# Altium PCB Briac_Charger.PcbDoc (part 4 of 4)
Units mm, origin at the board's own origin, x right, y up, seen from the top; angles counter-clockwise.
Board outline 70.05 x 79.98 mm, 2 copper layers (Top Layer, Bottom Layer), stack 1.448 mm thick; 114 components, 62 nets, 335 pads, 3733 vias.
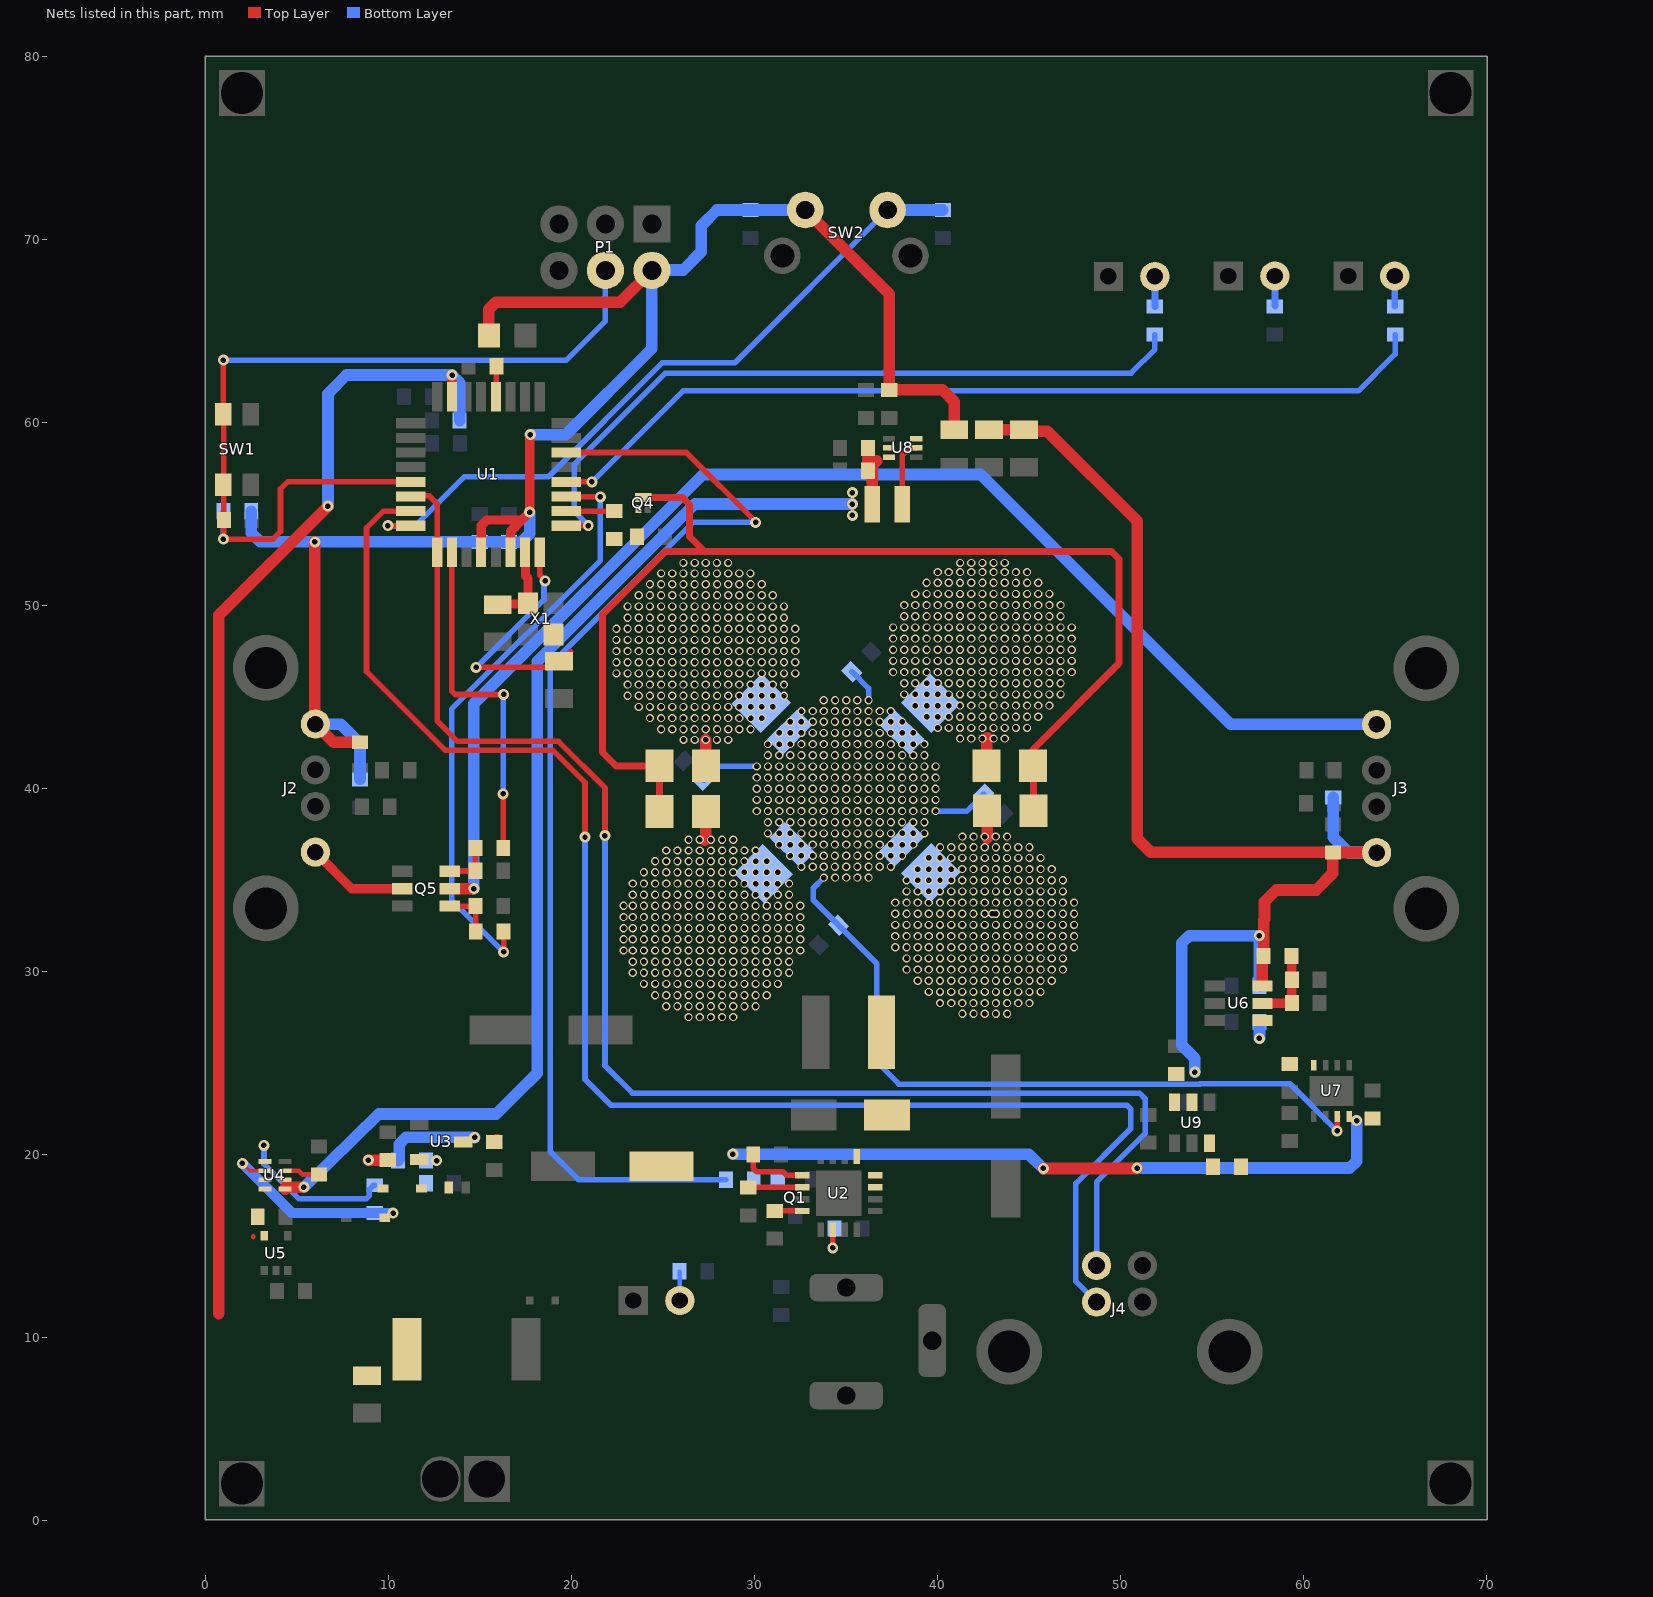
[diagram p3: the nets of this part, all layers, seen from the top]

## Via types
v1: diameter 0.45, hole 0.3, Top Layer to Bottom Layer, 2562 vias
v2: diameter 0.45, hole 0.3, Top Layer to Bottom Layer, tented both sides, 1106 vias
v3: diameter 0.6, hole 0.3, Top Layer to Bottom Layer, tented both sides, 65 vias

## Nets (pads, with @x,y where several pads share a name; then routed paths per layer and width w, separated by ;. In a path a pad name is that pad's centre, name@x,y a point inside that pad or via, vN(x,y) a via of type N, cw(c..) or ccw(c..) an arc to the next point about the centre after c; other vN are vias at no path point) (continued)
LAMP_GND: Q4.3 R26.1 R27.1 R28.1 R29.1 | length 64.5
  Top Layer w0.381: Q4.3@23.931,55.895 26.07,55.895 26.467,55.499 26.467,53.759 27.28,52.946 ; R29.1@24.816,38.735 R26.1@24.816,41.224 22.454,41.224 21.717,41.961 21.717,49.505 25.159,52.946 25.649,52.946 27.28,52.946 ; R28.1@45.25,38.799 45.25,41.224 45.25,42.151 49.936,46.838 49.936,52.54 49.53,52.946 27.28,52.946
  Top Layer w0.457: R28.1@45.25,38.799 R28.1@45.263,38.786
LED1: R11.2 U1.12 | length 49.3
  Top Layer w0.305: U1.12@19.729,56.75 19.732,56.747 21.13,56.747 v3(21.133,56.744)
  Bottom Layer w0.305: v3(21.133,56.744) 26.111,61.722 63.017,61.722 65.024,63.729 R11.2@65.024,64.795
LED3: R13.2 U1.9 | length 40
  Top Layer w0.305: U1.9@19.729,54.35 19.732,54.353 20.926,54.353 v3(20.93,54.356)
  Bottom Layer w0.305: v3(20.93,54.356) 20.168,55.118 20.168,57.709 20.472,58.014 25.146,62.687 50.597,62.687 51.892,63.983 R13.2@51.892,64.795
LED_IN: C32.1 C33.1 C34.1 C35.1 LED5.1 LED6.1 LED7.1 LED8.1 U7.7 | length 47.5
  Top Layer w0.305: v3(61.849,21.283) 61.867,21.3 61.867,22.067 U7.7@61.869,22.07
  Bottom Layer w0.305: C32.1@27.234,40.431 27.249,40.431 28.017,41.2 v2(30.141,41.2) ; v2(33.805,35.125) 33.223,34.543 33.223,33.894 C33.1@34.6,32.517 36.703,30.415 36.703,25.044 37.906,23.841 54.345,23.841 54.362,23.858 59.274,23.858 v3(61.849,21.283) ; C35.1@35.326,46.375 35.337,46.375 36.246,45.466 36.246,44.81 v2(36.244,44.808) ; v2(39.907,38.76) 41.619,38.76 C34.1@42.54,39.68
  other v2: 34.415,35.125 35.025,35.125 35.635,35.125 36.245,35.125 32.581,35.71 33.191,35.71 33.801,35.71 34.411,35.71 35.027,35.71 35.637,35.71 36.247,35.71 36.857,35.71 37.467,35.71 31.971,36.32 32.581,36.32 33.191,36.32 33.801,36.32 34.411,36.32 35.027,36.32 35.637,36.32 36.247,36.32 36.857,36.32 37.467,36.32 38.077,36.32 31.361,36.93 31.971,36.93 32.581,36.93 33.191,36.93 33.801,36.93 34.411,36.93 35.027,36.93 35.637,36.93 36.247,36.93 36.857,36.93 37.467,36.93 38.077,36.93 38.687,36.93 30.751,37.54 31.361,37.54 31.971,37.54 32.581,37.54 33.191,37.54 33.801,37.54 34.411,37.54 35.027,37.54 35.637,37.54 36.247,37.54 36.857,37.54 37.467,37.54 38.077,37.54 38.687,37.54 39.297,37.54 30.751,38.15 31.361,38.15 31.971,38.15 32.581,38.15 33.191,38.15 33.801,38.15 34.411,38.15 35.027,38.15 35.637,38.15 36.247,38.15 36.857,38.15 37.467,38.15 38.077,38.15 38.687,38.15 39.297,38.15 30.141,38.76 30.751,38.76 31.361,38.76 31.971,38.76 32.581,38.76 33.191,38.76 33.801,38.76 34.411,38.76 35.027,38.76 35.637,38.76 36.247,38.76 36.857,38.76 37.467,38.76 38.077,38.76 38.687,38.76 39.297,38.76 30.141,39.37 30.751,39.37 31.361,39.37 31.971,39.37 32.581,39.37 33.191,39.37 33.801,39.37 34.411,39.37 35.027,39.37 35.637,39.37 36.247,39.37 36.857,39.37 37.467,39.37 38.077,39.37 38.687,39.37 39.297,39.37 39.907,39.37 30.141,39.98 30.751,39.98 31.361,39.98 31.971,39.98 32.581,39.98 33.191,39.98 33.801,39.98 34.411,39.98 35.027,39.98 35.637,39.98 36.247,39.98 36.857,39.98 37.467,39.98 38.077,39.98 38.687,39.98 39.297,39.98 39.907,39.98 30.141,40.59 30.751,40.59 31.361,40.59 31.971,40.59 32.581,40.59 33.191,40.59 33.801,40.59 34.411,40.59 35.027,40.59 35.637,40.59 36.247,40.59 36.857,40.59 37.467,40.59 38.077,40.59 38.687,40.59 39.297,40.59 39.907,40.59 30.751,41.2 31.361,41.2 31.971,41.2 32.581,41.2 33.191,41.2 33.801,41.2 34.411,41.2 35.027,41.2 35.637,41.2 36.247,41.2 36.857,41.2 37.467,41.2 38.077,41.2 38.687,41.2 39.297,41.2 39.907,41.2 30.751,41.81 31.361,41.81 31.971,41.81 32.581,41.81 33.191,41.81 33.801,41.81 34.411,41.81 35.027,41.81 35.637,41.81 36.247,41.81 36.857,41.81 37.467,41.81 38.077,41.81 38.687,41.81 39.297,41.81 30.751,42.42 31.361,42.42 31.971,42.42 32.581,42.42 33.191,42.42 33.801,42.42 34.411,42.42 35.027,42.42 35.637,42.42 36.247,42.42 36.857,42.42 37.467,42.42 38.077,42.42 38.687,42.42 39.297,42.42 31.361,43.03 31.971,43.03 32.581,43.03 33.191,43.03 33.801,43.03 34.411,43.03 35.027,43.03 35.637,43.03 36.247,43.03 36.857,43.03 37.467,43.03 38.077,43.03 38.687,43.03 31.971,43.64 32.581,43.64 33.191,43.64 33.801,43.64 34.411,43.64 35.027,43.64 35.637,43.64 36.247,43.64 36.857,43.64 37.467,43.64 38.077,43.64 32.582,44.224 33.192,44.224 33.802,44.224 34.412,44.224 35.025,44.224 35.635,44.224 36.245,44.224 36.855,44.224 37.465,44.224 33.804,44.808 34.414,44.808 35.024,44.808 35.634,44.808
MOS_1: R32.2 U1.2 | length 18.9
  Top Layer w0.305: U1.2@13.479,52.9 13.479,45.307 13.657,45.129 v3(16.307,45.129) ; v3(16.281,39.7) 16.286,39.696 R32.2@16.286,36.744
  Bottom Layer w0.305: v3(16.281,39.7) 16.294,39.713 16.294,45.116 v3(16.307,45.129)
MOS_2: R34.2 U1.11 | length 32.5
  Top Layer w0.305: v3(16.307,31.064) R34.2@16.307,32.182 ; U1.11@19.729,55.95 19.786,56.007 19.888,55.905 19.913,55.931 v3(21.59,55.931)
  Bottom Layer w0.305: v3(16.307,31.064) 13.462,33.909 13.462,44.326 21.59,52.454 v3(21.59,55.931)
MOS_4: R30.2 U1.10 | length 2.6
  Top Layer w0.305: U1.10@19.729,55.15 19.732,55.153 22.349,55.153 R30.2@22.352,55.156
NetC3_2: C3.2 U1.20 | length 1.7
  Top Layer w0.305: U1.20@15.879,61.4 15.895,61.416 15.895,63.052 C3.2@15.911,63.068
NetC10_2: C10.2 U2.10 | length 3
  Top Layer w0.305: C10.2@29.667,18.186 29.687,18.207 U2.10@32.62,18.207
NetC19_2: C19.2 U4.7 | length 2.1
  Top Layer w0.254: U4.7@4.363,19.11 5.121,19.11 5.334,18.898 C19.2@6.223,18.898 C19.2@6.115,18.79
NetC39_2: R23.1 U9.6
NetD1_2: D1.2 L2.1 U2.3 U2.4 U2.5
NetL3_1: L3.1 U8.5 | length 3.6
  Top Layer w0.305: L3.1@38.097,55.525 38.097,58.225 38.47,58.598 U8.5@38.85,58.598
NetLED1_2: LED1.2 R11.1 | length 1.7
  Bottom Layer w0.381: R11.1@64.999,66.345 LED1.2@64.999,67.996
NetLED2_2: LED2.2 R12.1 | length 1.7
  Bottom Layer w0.381: R12.1@58.445,66.345 LED2.2@58.445,67.996
NetLED3_2: LED3.2 R13.1 | length 1.7
  Bottom Layer w0.381: R13.1@51.892,66.319 LED3.2@51.892,67.97
NetLED4_2: LED4.2 R2.1 | length 1.6
  Bottom Layer w0.203: R2.1@25.908,13.614 R2.1@25.933,13.589
  Bottom Layer w0.254: LED4.2@25.933,12.014 R2.1@25.933,13.589
NetLED5_2: LED5.2 R26.2 | length 1.4
  Top Layer w0.635: v2(27.354,42.644) 27.354,41.226 R26.2@27.356,41.224
  other v2: 26.134,42.644 26.744,42.644 27.964,42.644 28.574,42.644 24.91,43.228 25.52,43.228 26.13,43.228 26.74,43.228 27.356,43.228 27.966,43.228 28.576,43.228 29.186,43.228 29.796,43.228 24.3,43.838 24.91,43.838 25.52,43.838 26.13,43.838 26.74,43.838 27.356,43.838 27.966,43.838 28.576,43.838 29.186,43.838 29.796,43.838 30.406,43.838 23.69,44.448 24.3,44.448 24.91,44.448 25.52,44.448 26.13,44.448 26.74,44.448 27.356,44.448 27.966,44.448 28.576,44.448 29.186,44.448 29.796,44.448 30.406,44.448 31.016,44.448 23.08,45.058 23.69,45.058 24.3,45.058 24.91,45.058 25.52,45.058 26.13,45.058 26.74,45.058 27.356,45.058 27.966,45.058 28.576,45.058 29.186,45.058 29.796,45.058 30.406,45.058 31.016,45.058 31.626,45.058 23.08,45.668 23.69,45.668 24.3,45.668 24.91,45.668 25.52,45.668 26.13,45.668 26.74,45.668 27.356,45.668 27.966,45.668 28.576,45.668 29.186,45.668 29.796,45.668 30.406,45.668 31.016,45.668 31.626,45.668 22.47,46.278 23.08,46.278 23.69,46.278 24.3,46.278 24.91,46.278 25.52,46.278 26.13,46.278 26.74,46.278 27.356,46.278 27.966,46.278 28.576,46.278 29.186,46.278 29.796,46.278 30.406,46.278 31.016,46.278 31.626,46.278 32.236,46.278 22.47,46.888 23.08,46.888 23.69,46.888 24.3,46.888 24.91,46.888 25.52,46.888 26.13,46.888 26.74,46.888 27.356,46.888 27.966,46.888 28.576,46.888 29.186,46.888 29.796,46.888 30.406,46.888 31.016,46.888 31.626,46.888 32.236,46.888 22.47,47.498 23.08,47.498 23.69,47.498 24.3,47.498 24.91,47.498 25.52,47.498 26.13,47.498 26.74,47.498 27.356,47.498 27.966,47.498 28.576,47.498 29.186,47.498 29.796,47.498 30.406,47.498 31.016,47.498 31.626,47.498 32.236,47.498 22.47,48.108 23.08,48.108 23.69,48.108 24.3,48.108 24.91,48.108 25.52,48.108 26.13,48.108 26.74,48.108 27.356,48.108 27.966,48.108 28.576,48.108 29.186,48.108 29.796,48.108 30.406,48.108 31.016,48.108 31.626,48.108 32.236,48.108 22.47,48.718 23.08,48.718 23.69,48.718 24.3,48.718 24.91,48.718 25.52,48.718 26.13,48.718 26.74,48.718 27.356,48.718 27.966,48.718 28.576,48.718 29.186,48.718 29.796,48.718 30.406,48.718 31.016,48.718 31.626,48.718 32.236,48.718 23.08,49.328 23.69,49.328 24.3,49.328 24.91,49.328 25.52,49.328 26.13,49.328 26.74,49.328 27.356,49.328 27.966,49.328 28.576,49.328 29.186,49.328 29.796,49.328 30.406,49.328 31.016,49.328 31.626,49.328 23.08,49.938 23.69,49.938 24.3,49.938 24.91,49.938 25.52,49.938 26.13,49.938 26.74,49.938 27.356,49.938 27.966,49.938 28.576,49.938 29.186,49.938 29.796,49.938 30.406,49.938 31.016,49.938 31.626,49.938 23.69,50.548 24.3,50.548 24.91,50.548 25.52,50.548 26.13,50.548 26.74,50.548 27.356,50.548 27.966,50.548 28.576,50.548 29.186,50.548 29.796,50.548 30.406,50.548 31.016,50.548 24.3,51.158 24.91,51.158 25.52,51.158 26.13,51.158 26.74,51.158 27.356,51.158 27.966,51.158 28.576,51.158 29.186,51.158 29.796,51.158 30.406,51.158 24.912,51.742 25.522,51.742 26.132,51.742 26.742,51.742 27.354,51.742 27.964,51.742 28.574,51.742 29.184,51.742 29.794,51.742 26.133,52.315 26.743,52.315 27.353,52.315 27.963,52.315 28.573,52.315
NetLED6_2: LED6.2 R27.2 | length 1.6
  Top Layer w0.635: R27.2@42.697,41.224 42.697,42.723 42.748,42.774
  other v2: 41.247,42.72 41.857,42.72 42.467,42.72 43.077,42.72 43.687,42.72 40.023,43.304 40.633,43.304 41.243,43.304 41.853,43.304 42.469,43.304 43.079,43.304 43.689,43.304 44.299,43.304 44.909,43.304 39.413,43.914 40.023,43.914 40.633,43.914 41.243,43.914 41.853,43.914 42.469,43.914 43.079,43.914 43.689,43.914 44.299,43.914 44.909,43.914 45.519,43.914 38.803,44.524 39.413,44.524 40.023,44.524 40.633,44.524 41.243,44.524 41.853,44.524 42.469,44.524 43.079,44.524 43.689,44.524 44.299,44.524 44.909,44.524 45.519,44.524 46.129,44.524 38.193,45.134 38.803,45.134 39.413,45.134 40.023,45.134 40.633,45.134 41.243,45.134 41.853,45.134 42.469,45.134 43.079,45.134 43.689,45.134 44.299,45.134 44.909,45.134 45.519,45.134 46.129,45.134 46.739,45.134 38.193,45.744 38.803,45.744 39.413,45.744 40.023,45.744 40.633,45.744 41.243,45.744 41.853,45.744 42.469,45.744 43.079,45.744 43.689,45.744 44.299,45.744 44.909,45.744 45.519,45.744 46.129,45.744 46.739,45.744 37.583,46.354 38.193,46.354 38.803,46.354 39.413,46.354 40.023,46.354 40.633,46.354 41.243,46.354 41.853,46.354 42.469,46.354 43.079,46.354 43.689,46.354 44.299,46.354 44.909,46.354 45.519,46.354 46.129,46.354 46.739,46.354 47.349,46.354 37.583,46.964 38.193,46.964 38.803,46.964 39.413,46.964 40.023,46.964 40.633,46.964 41.243,46.964 41.853,46.964 42.469,46.964 43.079,46.964 43.689,46.964 44.299,46.964 44.909,46.964 45.519,46.964 46.129,46.964 46.739,46.964 47.349,46.964 37.583,47.574 38.193,47.574 38.803,47.574 39.413,47.574 40.023,47.574 40.633,47.574 41.243,47.574 41.853,47.574 42.469,47.574 43.079,47.574 43.689,47.574 44.299,47.574 44.909,47.574 45.519,47.574 46.129,47.574 46.739,47.574 47.349,47.574 37.583,48.184 38.193,48.184 38.803,48.184 39.413,48.184 40.023,48.184 40.633,48.184 41.243,48.184 41.853,48.184 42.469,48.184 43.079,48.184 43.689,48.184 44.299,48.184 44.909,48.184 45.519,48.184 46.129,48.184 46.739,48.184 47.349,48.184 37.583,48.794 38.193,48.794 38.803,48.794 39.413,48.794 40.023,48.794 40.633,48.794 41.243,48.794 41.853,48.794 42.469,48.794 43.079,48.794 43.689,48.794 44.299,48.794 44.909,48.794 45.519,48.794 46.129,48.794 46.739,48.794 47.349,48.794 38.193,49.404 38.803,49.404 39.413,49.404 40.023,49.404 40.633,49.404 41.243,49.404 41.853,49.404 42.469,49.404 43.079,49.404 43.689,49.404 44.299,49.404 44.909,49.404 45.519,49.404 46.129,49.404 46.739,49.404 38.193,50.014 38.803,50.014 39.413,50.014 40.023,50.014 40.633,50.014 41.243,50.014 41.853,50.014 42.469,50.014 43.079,50.014 43.689,50.014 44.299,50.014 44.909,50.014 45.519,50.014 46.129,50.014 46.739,50.014 38.803,50.624 39.413,50.624 40.023,50.624 40.633,50.624 41.243,50.624 41.853,50.624 42.469,50.624 43.079,50.624 43.689,50.624 44.299,50.624 44.909,50.624 45.519,50.624 46.129,50.624 39.413,51.234 40.023,51.234 40.633,51.234 41.243,51.234 41.853,51.234 42.469,51.234 43.079,51.234 43.689,51.234 44.299,51.234 44.909,51.234 45.519,51.234 40.025,51.818 40.635,51.818 41.245,51.818 41.855,51.818 42.467,51.818 43.077,51.818 43.687,51.818 44.297,51.818 44.907,51.818 41.246,52.315 41.856,52.315 42.466,52.315 43.076,52.315 43.686,52.315
NetLED7_2: LED7.2 R28.2 | length 1.5
  Top Layer w0.635: v2@42.723,37.287 R28.2@42.723,38.786
  other v2: 41.374,27.683 41.984,27.683 42.594,27.683 43.204,27.683 43.814,27.683 40.15,28.267 40.76,28.267 41.37,28.267 41.98,28.267 42.596,28.267 43.206,28.267 43.816,28.267 44.426,28.267 45.036,28.267 39.54,28.877 40.15,28.877 40.76,28.877 41.37,28.877 41.98,28.877 42.596,28.877 43.206,28.877 43.816,28.877 44.426,28.877 45.036,28.877 45.646,28.877 38.93,29.487 39.54,29.487 40.15,29.487 40.76,29.487 41.37,29.487 41.98,29.487 42.596,29.487 43.206,29.487 43.816,29.487 44.426,29.487 45.036,29.487 45.646,29.487 46.256,29.487 38.32,30.097 38.93,30.097 39.54,30.097 40.15,30.097 40.76,30.097 41.37,30.097 41.98,30.097 42.596,30.097 43.206,30.097 43.816,30.097 44.426,30.097 45.036,30.097 45.646,30.097 46.256,30.097 46.866,30.097 38.32,30.707 38.93,30.707 39.54,30.707 40.15,30.707 40.76,30.707 41.37,30.707 41.98,30.707 42.596,30.707 43.206,30.707 43.816,30.707 44.426,30.707 45.036,30.707 45.646,30.707 46.256,30.707 46.866,30.707 37.71,31.317 38.32,31.317 38.93,31.317 39.54,31.317 40.15,31.317 40.76,31.317 41.37,31.317 41.98,31.317 42.596,31.317 43.206,31.317 43.816,31.317 44.426,31.317 45.036,31.317 45.646,31.317 46.256,31.317 46.866,31.317 47.476,31.317 37.71,31.927 38.32,31.927 38.93,31.927 39.54,31.927 40.15,31.927 40.76,31.927 41.37,31.927 41.98,31.927 42.596,31.927 43.206,31.927 43.816,31.927 44.426,31.927 45.036,31.927 45.646,31.927 46.256,31.927 46.866,31.927 47.476,31.927 37.71,32.537 38.32,32.537 38.93,32.537 39.54,32.537 40.15,32.537 40.76,32.537 41.37,32.537 41.98,32.537 42.596,32.537 43.206,32.537 43.816,32.537 44.426,32.537 45.036,32.537 45.646,32.537 46.256,32.537 46.866,32.537 47.476,32.537 37.71,33.147 38.32,33.147 38.93,33.147 39.54,33.147 40.15,33.147 40.76,33.147 41.37,33.147 41.98,33.147 42.596,33.147 42.993,33.145 43.206,33.147 43.816,33.147 44.426,33.147 45.036,33.147 45.646,33.147 46.256,33.147 46.866,33.147 47.476,33.147 37.71,33.757 38.32,33.757 38.93,33.757 39.54,33.757 40.15,33.757 40.76,33.757 41.37,33.757 41.98,33.757 42.596,33.757 43.206,33.757 43.816,33.757 44.426,33.757 45.036,33.757 45.646,33.757 46.256,33.757 46.866,33.757 47.476,33.757 38.32,34.367 38.93,34.367 39.54,34.367 40.15,34.367 40.76,34.367 41.37,34.367 41.98,34.367 42.596,34.367 43.206,34.367 43.816,34.367 44.426,34.367 45.036,34.367 45.646,34.367 46.256,34.367 46.866,34.367 38.32,34.977 38.93,34.977 39.54,34.977 40.15,34.977 40.76,34.977 41.37,34.977 41.98,34.977 42.596,34.977 43.206,34.977 43.816,34.977 44.426,34.977 45.036,34.977 45.646,34.977 46.256,34.977 46.866,34.977 38.93,35.587 39.54,35.587 40.15,35.587 40.76,35.587 41.37,35.587 41.98,35.587 42.596,35.587 43.206,35.587 43.816,35.587 44.426,35.587 45.036,35.587 45.646,35.587 46.256,35.587 39.54,36.197 40.15,36.197 40.76,36.197 41.37,36.197 41.98,36.197 42.596,36.197 43.206,36.197 43.816,36.197 44.426,36.197 45.036,36.197 45.646,36.197 40.152,36.782 40.762,36.782 41.372,36.782 41.982,36.782 42.594,36.782 43.204,36.782 43.814,36.782 44.424,36.782 45.034,36.782 41.373,37.366 41.983,37.366 42.593,37.366 43.203,37.366 43.813,37.366
NetLED8_2: LED8.2 R29.2 | length 1.6
  Top Layer w0.635: 27.305,37.16 27.356,37.211 R29.2@27.356,38.735
  other v2: 26.414,27.505 27.024,27.505 27.634,27.505 28.244,27.505 28.854,27.505 25.19,28.09 25.8,28.09 26.41,28.09 27.02,28.09 27.635,28.09 28.245,28.09 28.855,28.09 29.465,28.09 30.075,28.09 24.58,28.7 25.19,28.7 25.8,28.7 26.41,28.7 27.02,28.7 27.635,28.7 28.245,28.7 28.855,28.7 29.465,28.7 30.075,28.7 30.685,28.7 23.97,29.31 24.58,29.31 25.19,29.31 25.8,29.31 26.41,29.31 27.02,29.31 27.635,29.31 28.245,29.31 28.855,29.31 29.465,29.31 30.075,29.31 30.685,29.31 31.295,29.31 23.36,29.92 23.97,29.92 24.58,29.92 25.19,29.92 25.8,29.92 26.41,29.92 27.02,29.92 27.635,29.92 28.245,29.92 28.855,29.92 29.465,29.92 30.075,29.92 30.685,29.92 31.295,29.92 31.905,29.92 23.36,30.53 23.97,30.53 24.58,30.53 25.19,30.53 25.8,30.53 26.41,30.53 27.02,30.53 27.635,30.53 28.245,30.53 28.855,30.53 29.465,30.53 30.075,30.53 30.685,30.53 31.295,30.53 31.905,30.53 22.856,31.14 23.36,31.14 23.97,31.14 24.58,31.14 25.19,31.14 25.8,31.14 26.41,31.14 27.02,31.14 27.635,31.14 28.245,31.14 28.855,31.14 29.465,31.14 30.075,31.14 30.685,31.14 31.295,31.14 31.905,31.14 32.515,31.14 22.856,31.75 23.36,31.75 23.97,31.75 24.58,31.75 25.19,31.75 25.8,31.75 26.41,31.75 27.02,31.75 27.635,31.75 28.245,31.75 28.855,31.75 29.465,31.75 30.075,31.75 30.685,31.75 31.295,31.75 31.905,31.75 32.515,31.75 22.856,32.36 23.36,32.36 23.97,32.36 24.58,32.36 25.19,32.36 25.8,32.36 26.41,32.36 27.02,32.36 27.635,32.36 28.245,32.36 28.855,32.36 29.465,32.36 30.075,32.36 30.685,32.36 31.295,32.36 31.905,32.36 32.515,32.36 22.856,32.97 23.36,32.97 23.97,32.97 24.58,32.97 25.19,32.97 25.8,32.97 26.41,32.97 27.02,32.97 27.635,32.97 28.245,32.97 28.855,32.97 29.465,32.97 30.075,32.97 30.685,32.97 31.295,32.97 31.905,32.97 32.515,32.97 22.856,33.58 23.36,33.58 23.97,33.58 24.58,33.58 25.19,33.58 25.8,33.58 26.41,33.58 27.02,33.58 27.635,33.58 28.245,33.58 28.855,33.58 29.465,33.58 30.075,33.58 30.685,33.58 31.295,33.58 31.905,33.58 32.515,33.58 23.36,34.19 23.97,34.19 24.58,34.19 25.19,34.19 25.8,34.19 26.41,34.19 27.02,34.19 27.635,34.19 28.245,34.19 28.855,34.19 29.465,34.19 30.075,34.19 30.685,34.19 31.295,34.19 31.905,34.19 23.36,34.8 23.97,34.8 24.58,34.8 25.19,34.8 25.8,34.8 26.41,34.8 27.02,34.8 27.635,34.8 28.245,34.8 28.855,34.8 29.465,34.8 30.075,34.8 30.685,34.8 31.295,34.8 31.905,34.8 23.97,35.41 24.58,35.41 25.19,35.41 25.8,35.41 26.41,35.41 27.02,35.41 27.635,35.41 28.245,35.41 28.855,35.41 29.465,35.41 30.075,35.41 30.685,35.41 31.295,35.41 24.58,36.02 25.19,36.02 25.8,36.02 26.41,36.02 27.02,36.02 27.635,36.02 28.245,36.02 28.855,36.02 29.465,36.02 30.075,36.02 30.685,36.02 25.191,36.604 25.801,36.604 26.411,36.604 27.021,36.604 27.634,36.604 28.244,36.604 28.854,36.604 29.464,36.604 30.074,36.604 26.412,37.188 27.022,37.188 27.632,37.188 28.242,37.188 28.852,37.188
NetQ1_1: Q1.1 R1.1
NetQ4_1: Q4.1 R30.1 R31.1 | length 0
  Top Layer w0.305: R30.1@22.339,53.645 R30.1@22.352,53.632 ; R31.1@23.584,53.759 R31.1@23.597,53.746 R31.1@23.602,53.741
NetQ5_4: Q5.4 R34.1 R35.1 | length 2.8
  Top Layer w0.305: Q5.4@13.365,33.569 R35.1@14.762,33.569 14.772,33.558 14.772,32.192 R34.1@14.783,32.182
NetQ5_6: Q5.6 R32.1 R33.1 | length 2.7
  Top Layer w0.305: Q5.6@13.365,35.469 13.38,35.484 14.747,35.484 R33.1@14.762,35.499 R32.1@14.762,36.744
NetR1_2: R1.2 U1.14 | length 63.2
  Top Layer w0.305: U1.14@19.729,58.35 26.283,58.35 v3@30.086,54.546
  Bottom Layer w0.305: R1.2@28.448,18.618 20.396,18.618 18.847,20.168 18.847,46.728 26.653,54.534 v3(30.074,54.534)
NetR5_1: R5.1 U2.12 | length 1.5
  Top Layer w0.305: R5.1@31.115,16.916 31.12,16.912 32.615,16.912 U2.12@32.62,16.907
NetR20_2: R20.2 U7.4
REF: C22.1 R15.2 R16.2 U6.5 | length 4.2
  Top Layer w0.508: U6.5@57.764,28.255 57.772,28.263 59.365,28.263 C22.1@59.373,28.27 59.366,28.277 59.366,30.829 R15.2@59.36,30.836
RESET: C9.1 P1.4 R6.1 SW1.1 U1.29 | length 48.7
  Top Layer w0.305: SW1.1@0.991,60.441 v3(0.991,63.398) ; SW1.1@1.003,60.428 1.003,53.632 v3(0.991,53.619) 3.708,53.619 4.115,54.026 4.115,56.363 4.502,56.75 U1.29@11.229,56.75
  Top Layer w0.508: SW1.1@0.991,60.441 SW1.1@1.003,60.428
  Bottom Layer w0.305: v3(0.991,53.619) R6.1@0.991,55.143 ; v3(0.991,63.398) 19.736,63.398 21.869,65.532 P1.4@21.869,68.301
RX: J4.2 U1.1 U1.30 | length 79.8
  Top Layer w0.305: U1.30@11.229,55.95 11.261,55.982 12.243,55.982 12.679,55.546 U1.1@12.679,52.9 12.679,43.684 13.792,42.57 19.304,42.57 21.844,40.03 v3(21.844,37.414)
  Bottom Layer w0.305: v3(21.844,37.414) 21.844,24.841 23.343,23.343 51.054,23.343 51.359,23.038 51.359,21.133 48.707,18.481 J4.2@48.707,13.93
STDBY: R3.1 U2.14 | length 1
  Top Layer w0.305: v3(34.29,14.884) 34.295,14.89 U2.14@34.295,15.882
SWITCH: R10.1 SW2.1 U1.32 | length 38.7
  Top Layer w0.305: v3(9.982,54.356) 9.985,54.353 11.226,54.353 U1.32@11.229,54.35
  Bottom Layer w0.305: v3(9.982,54.356) 11.481,54.356 14.148,57.023 18.745,57.023 24.968,63.246 28.933,63.246 SW2.1@37.287,71.6
  Bottom Layer w0.635: SW2.1@37.287,71.6 SW2.1@37.287,71.6 40.309,71.601 R10.1@40.31,71.603
TX: J4.3 U1.31 | length 84.1
  Top Layer w0.305: U1.31@11.229,55.15 9.735,55.15 8.814,54.229 8.814,46.38 13.106,42.088 18.974,42.088 20.752,40.31 v3(20.752,37.338)
  Bottom Layer w0.305: v3(20.752,37.338) 20.752,24.105 22.174,22.682 50.367,22.682 50.571,22.478 50.571,21.412 47.576,18.417 47.576,13.06 J4.3@48.707,11.93
USB_GND1: J2.4 Q5.2 | length 5.6
  Top Layer w0.508: J2.4@6.02,36.512 8.013,34.519 Q5.2@10.765,34.519
USB_GND2: J3.4 Q5.5 | length 71.6
  Top Layer w0.635: Q5.5@13.365,34.519 v3(14.681,34.519)
  Bottom Layer w0.635: v3(14.681,34.519) 14.681,44.628 27.203,57.15 42.367,57.15 56.024,43.493 J3.4@64.008,43.493
V_DCDC: C27.1 C28.1 L3.2 U4.5 U4.6 U8.2 U8.3 | length 63.4
  Top Layer w0.635: U4.5@4.363,18.11 4.38,18.093 4.38,18.158 4.395,18.174 4.395,18.212 4.413,18.23 4.431,18.212 v3(5.385,18.212) ; C28.1@36.205,57.353 C27.1@36.205,58.598 ; L3.2@36.447,55.525 L3.2@36.554,55.632 ; L3.2@36.453,55.632 C28.1@36.453,57.754 ; C28.1@36.554,57.754 36.687,57.887
  Bottom Layer w0.635: v3(5.385,18.212) 5.392,18.212 9.491,22.208 15.909,22.208 17.01,23.309 18.136,24.435 18.136,46.933 26.74,55.537 v3(35.357,55.537)
  other v3: 35.357,54.915 35.357,56.159
VBAT: C11.1 C14.1 C17.2 C20.1 C23.1 C24.1 R4.2 R7.2 R9.2 R14.1 R17.2 R19.2 U1.23 U2.9 U3.3 U4.1 U4.3 U4.4 U5.5 U6.4 U7.8 | length 120.1
  Top Layer w0.254: 2.633,15.479 2.633,15.529 ; R17.2@2.794,16.586 R17.2@2.807,16.573
  Top Layer w0.305: v3(3.211,20.487) v3@3.219,20.479 ; R4.2@29.947,19.99 29.947,19.229 30.125,19.05 31.572,19.05 31.766,18.857 U2.9@32.62,18.857
  Top Layer w0.508: U1.23@13.479,61.4 13.487,61.408 v3(13.487,62.586)
  Top Layer w0.635: 0.737,11.303 0.737,16.847 0.737,23.533 0.737,47.255 0.737,49.454 v3(6.706,55.423) ; v3(8.915,19.685) C20.1@9.976,19.685 ; C17.2@15.793,20.676 15.856,20.676 15.92,20.739 C17.2@15.92,20.803 ; R4.2@29.896,20.041 R4.2@29.947,19.99 ; v3(45.796,19.228) 50.902,19.228 v3(50.927,19.253)
  Bottom Layer w0.305: v3(3.211,20.487) 3.211,19.47 5.117,17.564 8.794,17.564 8.973,17.743 8.973,18.085 9.201,18.313 R19.2@9.265,18.313
  Bottom Layer w0.635: v3(6.706,55.423) 6.706,61.57 7.722,62.586 v3(13.487,62.586) 13.906,62.167 R9.2@13.906,60.103 ; R14.1@10.535,19.66 10.598,19.723 10.598,20.558 10.97,20.93 14.707,20.93 v3(14.715,20.922) ; v3(28.829,20.015) 45.009,20.015 v3(45.796,19.228) ; v3(50.927,19.253) 62.544,19.253 62.916,19.625 v3(62.916,21.844) ; v3(57.607,26.335) C23.1@57.607,27.229
VCC_5V: C1.1 C2.1 C13.1 C26.2 C29.1 C30.1 C31.1 CC2.1 J2.1 J3.1 L1.1 P1.2 R6.2 R15.1 R18.2 R22.2 R23.2 R24.2 R38.2 R40.2 SW2.2 U1.4 U1.6 U6.6 U8.6 U9.2 U9.3 | length 169.7
  Top Layer w0.508: U1.4@15.079,52.9 15.079,54.362 15.376,54.66 17.297,54.66 ; U1.6@16.679,52.9 16.676,52.903 16.676,54.039 17.297,54.66 ; v3(17.729,55.093) 17.728,59.283 v3(17.773,59.327) ; v3(17.729,55.093) 17.297,54.66
  Top Layer w0.635: v3(5.994,53.467) 5.994,43.537 J2.1@6.02,43.512 7.012,42.52 R18.2@8.458,42.52 ; L1.1@15.495,64.744 15.495,66.187 15.867,66.559 22.668,66.559 P1.2@24.409,68.301 ; SW2.2@32.526,71.861 SW2.2@32.787,71.6 37.373,67.014 R24.2@37.373,61.773 40.284,61.773 40.929,61.128 40.929,59.779 40.866,59.779 C31.1@40.675,59.589 ; C30.1@42.834,59.589 C29.1@44.993,59.589 ; C29.1@44.739,59.589 44.808,59.52 46.017,59.52 50.927,54.61 50.927,37.236 51.664,36.5 R38.2@61.62,36.5 ; U6.6@57.764,29.205 57.764,30.7 57.836,30.772 R15.1@57.836,30.836 57.836,31.953 57.836,32.791 57.883,32.839 57.883,33.804 58.522,34.442 60.706,34.442 61.62,35.357 R38.2@61.62,36.5 ; J3.1@64.008,36.493 64.005,36.497 61.624,36.497 R38.2@61.62,36.5
  Bottom Layer w0.635: R6.2@2.515,55.143 2.515,53.95 2.997,53.467 v3(5.994,53.467) C2.1@14.996,53.467 C1.1@16.596,53.467 C1.1@16.66,53.53 ; J2.1@6.02,43.512 7.415,43.512 8.458,42.469 R22.2@8.458,40.513 ; C1.1@16.332,53.442 17.269,53.442 17.729,53.902 v3(17.729,55.093) ; v3(17.773,59.327) 19.703,59.327 24.409,64.033 P1.2@24.409,68.301 24.435,68.326 26.111,68.326 27.102,69.317 27.102,70.739 27.965,71.603 C13.1@29.794,71.603 29.795,71.601 SW2.2@32.787,71.6 SW2.2@32.787,71.6 ; v3(54.077,24.489) 54.077,25.26 53.365,25.972 53.365,31.547 53.772,31.953 v3(57.607,31.953) CC2.1@57.607,29.208 ; R40.2@61.646,39.497 61.646,37.335 62.484,36.497 64.005,36.497 J3.1@64.008,36.493
VOUT: C16.1 C18.1 D4.2 R14.2 U3.2
  other v3: 12.643,19.66
VOUT#: D3.1 D4.1 R19.1 U4.2 | length 10.8
  Top Layer w0.203: v3(2.032,19.507) 2.429,19.11 U4.2@3.263,19.11
  Bottom Layer w0.559: v3(2.032,19.507) 4.75,16.789 v3(10.262,16.789)
XTAL_IN: C5.2 U1.7 X1.1 | length 4.5
  Top Layer w0.508: C5.2@15.987,50.038 16.025,50.076 17.6,50.076 X1.1@17.638,50.114 17.638,51.476 17.5,51.614 17.5,52.879 U1.7@17.479,52.9
XTAL_OUT: C6.2 U1.8 X1.3 | length 13.6
  Top Layer w0.305: v3(14.808,46.609) 18.999,46.609 19.431,47.041 19.685,47.041 19.939,47.295 19.939,47.448 19.964,47.473 ; U1.8@18.279,52.9 18.279,51.648 18.567,51.36 v3(18.567,51.333)
  Bottom Layer w0.305: v3(14.808,46.609) 18.511,50.312 18.511,51.277 v3(18.567,51.333)
pads on no net: J4.1 SW2.MH1 SW2.MH2 U1.13 U1.19 U1.22 U1.26 U1.27 U1.28 U5.1 U7.1 U7.2

## Polygon pours and split planes (outlines as drawn)
GND on Top Layer "Polygon_1" (hatched 45Degree grid 0.508 track 0.203, remove dead copper, pour order 6): 1.296,78.715 1.296,1.278 68.809,1.278 68.809,78.715
NetLED5_2 on Top Layer "Top Layer-No Net-5" (hatched 45Degree grid 0.508 track 0.203, pour order 30): 22.325,47.539 ccw(c27.357,47.539) 27.357,42.507 ccw(c27.357,47.539) 32.388,47.539 ccw(c27.357,47.539) 27.357,52.571 ccw(c27.357,47.539)
NetLED8_2 on Top Layer "Top Layer-No Net-4" (hatched 45Degree grid 0.508 track 0.203, pour order 33): 22.604,32.401 ccw(c27.636,32.401) 27.636,27.369 ccw(c27.636,32.401) 32.667,32.401 ccw(c27.636,32.401) 27.636,37.432 ccw(c27.636,32.401)
NetLED7_2 on Top Layer "Top Layer-No Net-3" (hatched 45Degree grid 0.508 track 0.203, pour order 32): 37.565,32.578 ccw(c42.597,32.578) 42.597,27.547 ccw(c42.597,32.578) 47.628,32.578 ccw(c42.597,32.578) 42.597,37.61 ccw(c42.597,32.578)
NetLED6_2 on Top Layer "Top Layer-No Net-2" (hatched 45Degree grid 0.508 track 0.203, pour order 31): 37.438,47.615 ccw(c42.47,47.615) 42.47,42.584 ccw(c42.47,47.615) 47.501,47.615 ccw(c42.47,47.615) 42.47,52.647 ccw(c42.47,47.615)
LED_IN on Top Layer "Top Layer-No Net-1" (hatched 45Degree grid 0.508 track 0.203, pour order 9): 29.996,40.021 ccw(c35.027,40.021) 35.027,34.989 ccw(c35.027,40.021) 40.059,40.021 ccw(c35.027,40.021) 35.027,45.052 ccw(c35.027,40.021)
no net on Top Layer "Top Layer-No Net" (solid, pour order 0): 0,70
GND on Bottom Layer "Polygon_2" (hatched 45Degree grid 0.508 track 0.203, remove dead copper, pour order 5): 1.27,78.73 1.27,1.293 68.783,1.293 68.783,78.73
NetLED5_2 on Bottom Layer "Bottom Layer-No Net-5" (hatched 45Degree grid 0.508 track 0.203, pour order 26): 22.325,47.539 ccw(c27.357,47.539) 27.357,42.507 ccw(c27.357,47.539) 32.388,47.539 ccw(c27.357,47.539) 27.357,52.571 ccw(c27.357,47.539)
NetLED8_2 on Bottom Layer "Bottom Layer-No Net-4" (hatched 45Degree grid 0.508 track 0.203, pour order 29): 22.604,32.401 ccw(c27.636,32.401) 27.636,27.369 ccw(c27.636,32.401) 32.667,32.401 ccw(c27.636,32.401) 27.636,37.432 ccw(c27.636,32.401)
NetLED7_2 on Bottom Layer "Bottom Layer-No Net-3" (hatched 45Degree grid 0.508 track 0.203, pour order 28): 37.565,32.578 ccw(c42.597,32.578) 42.597,27.547 ccw(c42.597,32.578) 47.628,32.578 ccw(c42.597,32.578) 42.597,37.61 ccw(c42.597,32.578)
NetLED6_2 on Bottom Layer "Bottom Layer-No Net-2" (hatched 45Degree grid 0.508 track 0.203, pour order 27): 37.438,47.615 ccw(c42.47,47.615) 42.47,42.584 ccw(c42.47,47.615) 47.501,47.615 ccw(c42.47,47.615) 42.47,52.647 ccw(c42.47,47.615)
LED_IN on Bottom Layer "Bottom Layer-No Net-1" (hatched 45Degree grid 0.508 track 0.203, pour order 8): 29.996,40.021 ccw(c35.027,40.021) 35.027,34.989 ccw(c35.027,40.021) 40.059,40.021 ccw(c35.027,40.021) 35.027,45.052 ccw(c35.027,40.021)
no net on Mechanical 2 "NONET_L-01_P-001" (solid): 1.27,78.73

## Other copper
Top Layer:
  rectangle net NetC39_2: 54.508,18.898 55.499,21.107
  rectangle net VCC_5V: 56.185,18.796 57.074,24.054
  rectangle net #VS: 31.09,19.99 31.725,25.832
  rectangle net NetD1_2: 36.22,18.034 39.116,28.804
  rectangle net NetQ4_1: 23.343,53.721 23.825,55.448
  rectangle net NetQ4_1: 21.742,53.188 24.003,54.254
  rectangle net VBAT: 0.864,20.142 3.175,23.952
  rectangle net CHRG_5V: 3.353,11.659 4.724,13.132
  rectangle net CHRG_5V: 3.632,12.09 4.089,13.919
  rectangle net VBAT: 0.483,22.708 15.215,24.359
  rectangle net IN: 14.351,0.94 18.478,12.471
  rectangle net VBAT: 23.012,18.745 30.404,21.285
  rectangle net VBAT: 13.589,20.371 30.404,24.359
  rectangle net VBAT: 64.668,22.25 65.761,26.975
  rectangle net VBAT: 57.201,26.01 65.761,27.61
  rectangle net VBAT: 62.281,21.488 65.761,22.428
  rectangle net NetR20_2: 58.75,24.562 60.731,25.425
  rectangle net VCC_5V: 53.594,23.774 57.074,25.095
  rectangle net VCC_5V: 52.578,22.352 54.204,25.095
  rectangle net CHRG_5V: 42.342,19.939 54.229,21.184
  rectangle net CHRG_5V: 42.342,17.78 44.602,20.396
  rectangle net CHRG_5V: 35.381,15.342 44.602,16.434
  rectangle net CHRG_5V: 36.22,15.9 44.602,17.805
  rectangle net NetD1_2: 38.202,18.034 40.64,24.257
  rectangle net NetD1_2: 35.408,19.38 37.059,23.139
  rectangle net #VS: 31.09,19.38 33.833,20.498
  rectangle net #VS: 31.09,23.343 34.315,28.727
  rectangle net VBAT: 0.406,10.617 2.667,15.24
  rectangle net VBAT: 0.406,7.417 11.887,11.1
  rectangle net VBAT: 2.515,19.456 3.658,23.952
  rectangle net VOUT#: 8.763,14.961 10.592,18.415
  rectangle net #5V: 4.013,14.961 8.179,17.196
  rectangle net VBAT: 0.406,14.961 3.658,18.733
  rectangle net VOUT: 11.125,17.45 13.538,20.041
  rectangle net V_DCDC: 3.99,17.577 5.055,18.733
  rectangle net V_DCDC: 35.027,54.524 36.855,56.524
  rectangle net V_DCDC: 35.636,54.524 36.687,59.182
  rectangle net XTAL_OUT: 18.491,46.406 20.193,48.997
  rectangle net VCC_5V: 57.099,28.807 58.471,33.223
  rectangle net V_DCDC: 35.839,56.82 37.694,58.75
  rectangle net BOOST_FB: 36.982,58.953 37.77,60.63
  rectangle net VCC_5V: 38.405,58.928 45.593,60.198
  rectangle net DM2: 61.112,37.541 62.205,39.726
  pour cut-out: 32.461,29.362 32.461,24.003 38.176,24.003 38.176,29.362
Bottom Layer:
  rectangle net IN: 14.173,0.381 18.059,3.531
  rectangle net NetR1_2: 27.838,18.034 28.956,19.202
  rectangle net VOUT: 11.297,17.374 12.979,20.193
  rectangle net NetQ1_1: 29.515,18.059 31.826,19.279
  rectangle net STDBY: 33.833,14.402 34.773,16.408
  rectangle net CHRG_5V: 35.331,13.792 37.719,17.805
  rectangle net CHRG_5V: 26.924,11.913 37.719,14.097
  rectangle net VBAT: 8.382,17.399 11.024,20.193

## Silkscreen, mask and mechanical layers (free items; w line width, h text height)
Top Overlay:
  drawing of 3418 lines, arcs and shapes, not listed
  text "MOSI" at 19.837,72.339 h1.52 r90
  text "SCK" at 22.301,72.339 h1.52 r90
  text "MISO" at 24.917,72.339 h1.52 r90
  text "CONTROL_SW" at 39.268,71.577 h1.91
  text "ISP_PROG" at 8.255,70.104 h1.91
  text "RST" at 21.209,66.904 h1.52 r270
  text "5V" at 23.927,66.904 h1.52 r270
  text "GND" at 18.796,66.777 h1.52 r270
  text "ZERO CARBON FOOTPRINT" at 48.438,49.098 h0.89
  text "CHG_OUT2" at 52.807,44.856 h1.91
  text "CHG_OUT1" at 7.595,44.806 h1.91
  text "hiLyte PCB v3.0" at 24.74,33.579 h1.52
  text "USB" at 56.261,13.742 h1.91
  text "BATTERY" at 9.925,5.332 h1.91
  text "-VE" at 9.925,3.605 h1.91
  text "+VE" at 14.116,3.605 h1.91
  text "DC_POWER" at 19.507,0.203 h1.91
Bottom Overlay:
  drawing of 3062 lines, arcs and shapes, not listed
  text "MOSI" at 18.872,72.339 h1.52 r270
  text "SCK" at 21.336,72.339 h1.52 r270
  text "MISO" at 23.952,72.339 h1.52 r270
  text "RST" at 22.479,66.904 h1.52 r90
  text "5V" at 25.171,66.904 h1.52 r90
  text "GND" at 19.761,66.751 h1.52 r90
  text "ZERO CARBON FOOTPRINT" at 67.564,49.098 h0.89
  text "5V" at 4.928,42.775 h1.52
  text "GND2" at 68.885,42.748 h1.52
  text "DP2" at 67.906,40.31 h1.52
  text "DM1" at 4.928,40.275 h1.52
  text "DP1" at 4.928,38.275 h1.52
  text "DM2" at 67.943,38.252 h1.52
  text "5V" at 67.906,35.814 h1.52
  text "GND1" at 4.928,35.775 h1.52
  text "hiLyte PCB v3.0" at 45.999,26.865 h1.52
  text "RX" at 47.792,13.321 h1.52
  text "TX" at 47.792,11.321 h1.52
  text "GND" at 52.121,11.321 h1.52
Mechanical 1:
  circle w0.254: c42.47,47.615 r5.032
  circle w0.254: c35.027,40.021 r5.032
  circle w0.254: c42.589,32.528 r5.032
  circle w0.254: c27.652,32.385 r5.032
  circle w0.254: c27.432,47.505 r5.032
  lines w0.254: 0,0 0,80 70.053,80 ; 0,40 70.053,40 ; 35.025,0 35.025,80 ; 41.599,33.426 35.025,40 28.453,33.428 ; 41.601,46.576 41.601,33.428 28.453,33.428 ; 28.434,46.595 28.434,33.447 28.453,33.428 ; 28.434,46.595 41.582,46.595 35.008,40.021 28.434,46.595
Mechanical 2:
  lines w0.254: 0,1.293 70.053,1.293 ; 0,78.73 70.053,78.73 ; 1.27,0.023 1.27,80 ; 68.783,0.023 68.783,80 ; 0,80 70.053,80 ; 0,80 0,0.023 69.698,0.023 ; 0,80 70.053,80 ; 69.698,0.023 70.053,0.023 70.053,80 ; 69.698,0.023 69.698,0.023

## Dimensions
2.007,78.001 to 0,80 on Mechanical 1
0,80 to 2.007,78.001 on Mechanical 1
70.053,80 to 68.054,77.993 on Mechanical 1
68.054,77.993 to 70.053,80 on Mechanical 1
68.047,2.022 to 70.053,0.023 on Mechanical 1
68.047,2.022 to 70.053,0.023 on Mechanical 1
1.999,2.007 to 0,0.023 on Mechanical 1
0,0.023 to 1.999,2.007 on Mechanical 1
18.059,67.157 to 0,80 on Mechanical 1
0,80 to 21.869,71.983 on Mechanical 1
70.053,80 to 49.352,67.97 on Mechanical 1
39.287,73.68 to 49.352,67.97 on Mechanical 1
51.892,67.97 to 55.905,67.996 on Mechanical 1
58.445,67.996 to 62.459,67.996 on Mechanical 1
64.999,67.996 to 70.053,80 on Mechanical 1
23.393,12.014 to 0,0.023 on Mechanical 1
26.563,10.114 to 30.374,-0.946 on Mechanical 1
42.89,-1.18 to 57.032,-1.18 on Mechanical 1
57.023,15.113 to 57.023,-1.187 on Mechanical 1
57.032,-1.18 to 0,0.023 on Mechanical 1
39.874,-0.946 to 42.875,0.635 on Mechanical 1
57.023,0.457 to 70.053,0.023 on Mechanical 1
62.484,46.891 to 7.544,46.867 on Mechanical 1
0,80 to 30.785,70.406 on Mechanical 1
0,80 to 35.025,80 on Mechanical 1
35.025,80 to 70.053,80 on Mechanical 1
6.02,43.512 to 0,80 on Mechanical 1
64.008,43.493 to 70.053,80 on Mechanical 1
0,0 to 0,80 on Mechanical 1
70.053,0.023 to 0,0 on Mechanical 1

## Text inside footprints (layer, text, board x,y; h text height)
J1: Top Overlay "Board Edge" at 31.344,-0.444 h0.5 r90
J4: Top Overlay "Board Edge" at 45.715,1.123 h0.8
SW2: Top Overlay "Board Edge" at 37.044,69.607 h0.4 r180